# Altium PCB OmniCore_SDR.PcbDoc (part 4 of 13)
Units mil, origin at the board's own origin, x right, y up, seen from the top; angles counter-clockwise.
Board outline 4724.72 x 2755.91 mil, 8 copper layers (Top, GND 1, Layer 1, Layer 2, GND 2, Layer 3, Power, Bottom), stack 40.468 mil thick; 530 components, 427 nets, 2315 pads, 1715 vias.
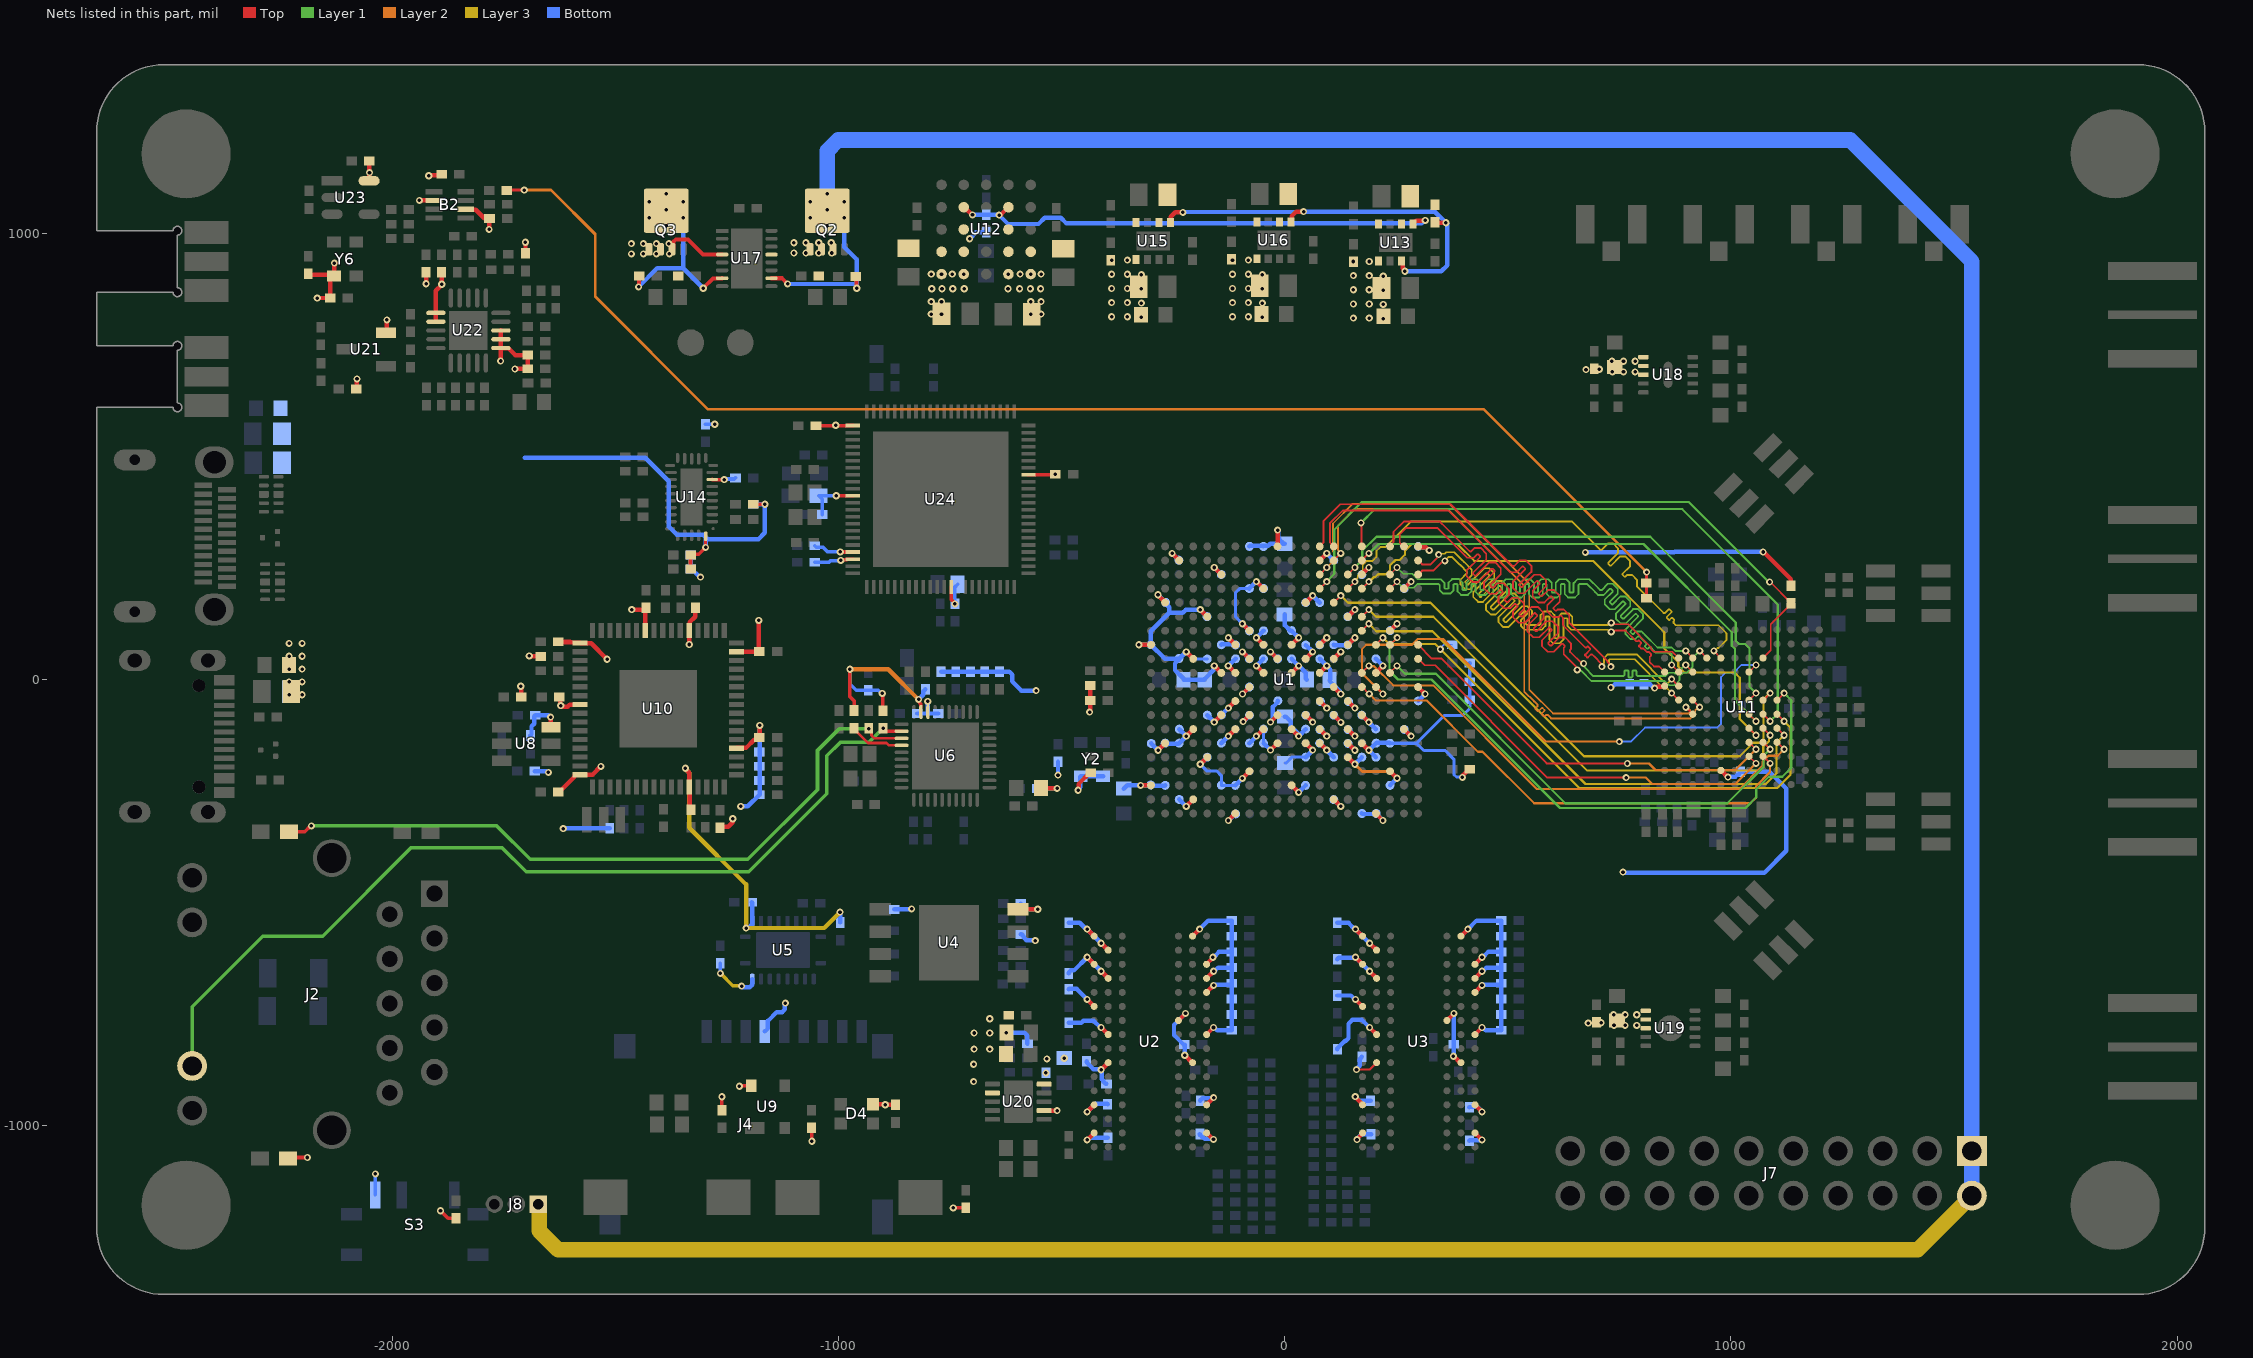
[diagram p9: the nets of this part, all layers, seen from the top]

## Via types
v1: diameter 16, hole 8, Top to Bottom, tented both sides, 1667 vias
v2: diameter 19.68, hole 7.87, Top to Bottom, 44 vias
v3: diameter 200, hole 125, Top to Bottom, 4 vias

## Nets (pads, with @x,y where several pads share a name; then routed paths per layer and width w, separated by ;. In a path a pad name is that pad's centre, name@x,y a point inside that pad or via, vN(x,y) a via of type N, cw(c..) or ccw(c..) an arc to the next point about the centre after c; other vN are vias at no path point)
1V0: C8.2 C9.2 C10.2 C11.2 C12.2 C13.2 C14.2 C15.2 C40.2 C41.2 C172.2 C173.2 C238.2 C241.1 C263.2 C264.2 C265.2 C266.2 C267.2 C268.2 C303.2 C307.2 U1.G7 U1.G11 U1.G13 U1.H10 U1.H12 U1.J7 U1.J13 U1.K12 U1.L7 U1.L13 U1.M12 U1.N7 U1.N13 U1.P8 U1.P12 U1.R7 U1.R13 U12.A1 U12.B1 U12.D1 U12.E1 | length 901.7
  Top w10: v1(-126.39,30.71) -126.31,30.71 -110.56,14.96 U1.G11@-110.48,14.96 ; v1(-126.23,-126.77) U1.G7@-110.48,-111.02 ; v1(-126.23,93.7) U1.G13@-110.48,77.95 ; v1(-94.73,62.2) U1.H12@-78.98,46.46 ; v1(-94.6,-32.28) -94.6,-32.22 -78.98,-16.6 U1.H10@-78.98,-16.54 ; v1(-63.24,-126.77) U1.J7@-47.49,-111.02 ; v1(-63.24,93.7) U1.J13@-47.49,77.95 ; v1(-31.74,62.2) U1.K12@-15.99,46.46 ; U1.L7@15.5,-111.02 v1(31.25,-126.77) ; U1.L13@15.5,77.95 v1(31.25,93.7) ; U1.M12@47,46.46 v1(62.75,62.2) ; U1.N7@78.5,-111.02 v1(94.24,-126.77) ; U1.N13@78.5,77.95 v1(94.24,93.7) ; U1.P8@109.99,-79.53 109.99,-79.66 126.1,-95.77 v1(126.1,-95.9) v1@126.23,-95.9 ; U1.P12@109.99,46.46 v1(125.74,62.2) ; U1.R7@141.36,-111.02 U1.R7@141.49,-111.02 v1(157.24,-126.77) ; U1.R13@141.49,77.95 v1(157.24,93.7)
  Bottom w10: C14.2@-142,77.9 -140.7,79.2 C173.2@-111.72,79.2 ; C41.2@-141.9,-142.4 v1(-126.23,-126.77) ; v1(-126.39,30.71) -126.14,30.71 -110.25,46.6 C266.2@-110,46.6 ; v1(-126.23,93.7) C173.2@-111.72,79.2 ; C173.2@-110.2,77.7 C173.2@-111.7,79.2 ; v1(-94.73,62.2) -94.73,62.07 -79.4,46.74 C40.2@-79.4,46.6 ; v1@-94.6,-32.24 C267.2@-79,-16.6 ; C268.2@-79,-142.5 v1@-63.25,-126.77 ; v1(-63.24,93.7) -63.12,93.7 -47.52,109.3 C9.2@-47.4,109.3 ; v1(-31.74,62.2) -31.57,62.2 -15.77,46.4 C8.2@-15.6,46.4 ; C303.2@-0.1,146.24 -0.1,121.3 0,121.2 1.19,121.2 12.77,109.63 15.4,109.63 31.25,93.77 v1(31.25,93.7) ; C307.2@0.4,-82.94 2.37,-82.94 13.12,-93.69 13.12,-104.58 30.1,-121.57 30.1,-125.62 v1(31.25,-126.77) ; v1@31.25,-126.71 47,-110.96 C263.2@47,-110.9 ; C11.2@47.3,77.4 47.43,77.4 62.62,62.2 v1(62.75,62.2) ; C10.2@78.5,77.9 v1(94.24,93.7) ; C264.2@79.1,-112 79.29,-112 94.06,-126.77 v1(94.24,-126.77) ; C13.2@110,78 111.3,76.7 140.3,76.7 C12.2@141.3,77.7 ; C15.2@110.15,-80 v1(126.1,-95.9) ; C12.2@141.3,77.7 v1(157.24,93.7) ; C265.2@142.1,-112 142.28,-112 157.05,-126.77 v1(157.24,-126.77)
  other v1: -792,819 -769,819 -569,819 -546,819 -792,847 -769,847 -569,847 -546,847 -791,876 -768,876 -744,876 -718,876 -620,876 -594,876 -570,876 -547,876 -792,908.69 -769,908.69 -745,908.69 -719,908.69 -619,908.69 -593,908.69 -569,908.69 -546,908.69
1V0_PG: R120.1 U12.B4 U12.D4 U13.1 | length 1123.7
  Top w10: U12.B4@-719,1058.69 -717.92,1058.69 -700.71,1041.47 v1(-699.63,1041.47) ; v1(-640,1041) -638.85,1042.15 -635.54,1042.15 U12.D4@-619,1058.69 ; U13.1@287.39,1020.71 287.39,1022.68 290.26,1025.55 292.23,1025.55 294.53,1027.85 314.01,1027.85 v1(315.16,1029)
  Bottom w10: v1(-699.63,1041.47) -699.58,1041.42 -669.05,1041.42 R120.1@-669,1041.37 -668.82,1041.19 -640.18,1041.19 v1(-640,1041) -620,1021 -551.69,1021 -537.69,1035 -502,1035 -490,1023 307.53,1023 313.53,1029 v1(315.16,1029)
1V8: C24.2 C25.2 C26.2 C27.2 C28.2 C29.2 C30.2 C31.2 C46.2 C47.2 C59.2 C60.2 C64.2 C65.2 C66.2 C67.2 C68.2 C69.2 C72.2 C73.2 C132.1 C136.2 C137.2 C138.2 C176.2 C180.2 C187.2 C189.2 C190.2 C191.2 C204.2 C205.2 C234.2 C248.2 C253.2 C254.2 C258.2 C259.2 C269.2 C270.2 C271.2 C272.2 C301.2 C306.2 C309.2 L1.2 L2.2 R5.1 R6.1 R64.1 R65.1 R66.1 R67.1 R69.2 R119.2 R122.2 U1.A13 U1.B16 U1.D12 U1.E15 U1.F8 U1.F11 U1.G9 U1.H8 U1.J11 U1.K8 U1.L11 U1.M8 U1.N9 U1.N11 U1.N19 U1.P10 U1.R9 U1.R15 U1.T8 U1.T18 U1.U11 U1.V14 U1.W7 U1.W17 U1.Y10 U1.Y20 U5.2 U6.28 U10.12 U10.37 U10.49 U10.64 U11.B8 U11.H12 U13.4 U13.5 U18.1 U18.2 U18.3 U19.1 U19.2 U19.3 | length 4682.6
  Top w4.2: v1(-800,-49) -799.7,-49.3 -799.7,-72.3 U6.28@-799.4,-72.6
  Top w10: C189.2@-1627.65,-252 -1625.69,-252 -1590.46,-216.78 -1590.46,-214.02 -1589.56,-213.11 U10.64@-1578.73,-213.11 -1551.11,-213.11 v1(-1532.4,-194.4) ; v1(-1518.6,45.6) -1554.26,81.26 -1577.83,81.26 U10.49@-1578.73,82.17 -1579.64,83.07 -1598.91,83.07 ; v1(-1343.1,-198.7) -1343.1,-200.32 -1334.64,-208.79 U10.12@-1334.64,-240.67 ; v1(-1334.38,78.56) -1334.38,109.47 U10.37@-1334.64,109.72 -1333.73,110.63 -1333.73,128.27 -1321,141 -1321,160.65 C191.2@-1320.34,161.31 ; U10.12@-1333.73,-242.48 -1333.73,-287.92 C190.2@-1330.34,-291.31 ; v1(-437,-73) -436.18,-72.18 -436.18,-47.81 R5.1@-435.37,-47 R6.1@-435.37,-13 ; v1(-326.63,77.98) U1.A13@-299.46,77.95 ; v1(-283.94,190) -283.94,189.21 -267.96,173.23 U1.B16@-267.96,172.44 ; v1(-220.72,62.2) U1.D12@-204.97,46.46 ; v1(-189.22,156.69) U1.E15@-173.47,140.94 ; v1(-157.72,-95.28) U1.F8@-141.98,-79.53 ; v1(-157.72,30.71) U1.F11@-141.98,14.96 ; v1(-126.23,-63.78) U1.G9@-110.48,-48.03 ; v1(-93.18,-94.28) -93.18,-94 -78.98,-79.81 U1.H8@-78.98,-79.53 ; v1(-63.24,30.71) U1.J11@-47.49,14.96 ; v1(-31.74,-95.28) U1.K8@-15.99,-79.53 ; U1.L11@15.5,14.96 v1(31.25,30.71) ; U1.M8@47,-79.53 v1(62.75,-95.28) ; U1.N9@78.5,-48.03 v1(94.24,-63.78) ; U1.N11@78.5,14.96 v1(94.24,30.71) ; U1.N19@78.5,266.93 v1(94.24,282.68) ; U1.P10@109.99,-16.54 v1(125.74,-32.28) ; U1.R9@141.49,-48.03 v1(157.24,-63.78) ; U1.R15@141.49,140.94 v1(157.24,156.69) ; U1.T8@172.98,-79.53 v1(188.73,-95.28) ; U1.T18@172.98,235.43 v1(188.73,251.18) ; U1.U11@204.48,14.96 v1(220.23,30.71) ; U1.V14@235.98,109.45 v1(251.72,125.2) ; U1.W7@267.47,-111.02 v1(283.22,-126.77) ; U1.W17@267.47,203.94 v1(283.22,219.68) ; U1.Y10@298.97,-16.54 v1(314.72,-32.28) ; U1.Y20@298.97,298.43 300.44,296.95 315.93,296.95 323.38,289.5 v1(324,289.5) ; v1(829,-19) 830.62,-19 833.91,-15.72 850.34,-15.72 U11.H12@851.51,-14.54 ; U11.B8@977.5,-203.52 977.98,-203.52 993.01,-218.54 v1(993.5,-218.54) ; v1(1072.25,285.86) 1073.5,285.86 1134.5,224.86 1134.5,210.19 R119.2@1134.4,210.09 ; -1598.91,83.07 -1625.72,83.07 C187.2@-1627.65,85 -1600.84,85 -1598.91,83.07
  Layer 3 w10: v1(-1343.1,-198.7) -1343.1,-200.32 -1334.4,-209.02 -1334.4,-331.74 -1207,-459.14 v1(-1207,-557) -1206.69,-556.69 -1031.98,-556.69 v1(-996.46,-521.17)
  Bottom w7: v1(-220.72,62.2) -204.72,46.21 C176.2@-173.42,46.21
  Bottom w10: v1(-1207,-557) -1205.85,-555.85 -1201.35,-555.85 U5.2@-1193.39,-547.89 ; C132.1@-1194.53,-499.04 -1193.11,-500.46 U5.2@-1193.11,-547.61 ; v1(-996.46,-521.17) -996.34,-521.29 -996.34,-544.23 R69.2@-996.21,-544.35 ; C136.2@-823,-76 -799.5,-76 ; v1(-800,-49) -799.5,-49.5 -799.5,-76 ; C137.2@-776,-76 -799.5,-76 ; R64.1@-770,17.68 R65.1@-737,17.68 R66.1@-704,17.68 R67.1@-672,17.68 C138.2@-639,17.69 -616.86,17.69 -610.51,11.34 -610.51,-4.22 -590.13,-24.6 v1(-557.1,-24.6) ; v1(-326.63,77.98) C270.2@-299.9,78 ; v1(-283.94,190) C269.2@-266.9,173 -266.9,170.29 -259,162.39 -259,149.5 ; C271.2@-237.88,47.1 -269,47.1 C270.2@-299.9,78 ; C271.2@-236.41,45.63 -245.8,36.24 -245.8,20.93 -226.44,1.57 C309.2@-226.44,-0.4 -179.26,-0.4 L1.2@-179.16,-0.5 -179.16,1.47 -158.87,21.76 -158.87,29.56 v1(-157.72,30.71) ; C271.2@-236.41,46.51 v1(-220.72,62.2) ; C272.2@-174,141.1 -174,141.29 -189.22,156.51 v1(-189.22,156.69) -221.33,156.69 -228.52,149.5 -259,149.5 ; C47.2@-173.4,-79.6 v1(-157.72,-95.28) ; C180.2@-141.9,-79.6 -141.9,-79.53 -126.23,-63.85 v1(-126.23,-63.78) ; v1(-93.18,-94.28) -93.18,-94.18 -79,-80 C28.2@-79,-79.9 ; v1(-63.24,30.71) C25.2@-47.5,46.4 ; v1(-31.74,-95.28) -31.74,-93.65 -26.32,-88.23 -26.32,-61.22 -15.2,-50.11 C27.2@-15.2,-47.4 ; C24.2@15.4,46.4 15.48,46.4 31.17,30.71 v1(31.25,30.71) 32.29,30.71 47.4,15.6 47.4,2.16 L2.2@49.56,0 ; C46.2@47.1,-80 47.29,-80 62.56,-95.28 v1(62.75,-95.28) ; C26.2@78.6,46.4 v1(94.24,30.71) ; C30.2@79.9,-49 79.9,-49.22 94.24,-63.56 v1(94.24,-63.78) ; v1(94.24,30.71) 94.24,30.46 102.3,22.4 102.3,0.86 C306.2@100.44,-1 100.44,-2.97 124.59,-27.12 124.59,-31.14 v1(125.74,-32.28) ; v1(94.24,282.68) 94.33,282.68 110.01,267 C59.2@110.1,267 ; C72.2@141.4,140.9 v1(157.24,156.69) ; C31.2@142.9,-49 142.9,-49.22 157.24,-63.56 v1(157.24,-63.78) ; C29.2@172.7,-79.6 172.88,-79.6 188.55,-95.28 v1(188.73,-95.28) 188.73,-95.45 204,-110.72 C65.2@204,-110.9 ; C69.2@173,235.1 173,235.28 188.73,251.01 v1(188.73,251.18) ; C68.2@204.5,46.5 v1(220.23,30.71) ; C67.2@236.3,109.7 v1(251.72,125.2) ; C64.2@267.9,-111.6 267.97,-111.6 283.15,-126.77 v1(283.22,-126.77) ; C73.2@268,204.1 268,204.28 283.22,219.5 v1(283.22,219.68) ; C66.2@299.2,-47.8 v1(314.72,-32.28) ; C60.2@299.3,298.5 301.21,296.59 315.29,296.59 322.38,289.5 v1(324,289.5) ; v1(673.9,284.9) 872.44,284.9 874.14,286.6 v1@1071.06,286.6 ; v1(731,-17.7) 732.62,-17.7 739.47,-10.86 C205.2@773.5,-10.86 C301.2@805.5,-10.86 819.23,-10.86 827.38,-19 v1(829,-19) ; v1(758.16,-431.34) 759.82,-433 1075.2,-433 1124.3,-383.9 1124.3,-244.1 1086.43,-206.23 C204.2@1021.5,-206.23 1021.5,-208.2 1016.65,-213.04 1014.69,-213.04 1010.33,-217.4 994.64,-217.4 v1(993.5,-218.54) ; C270.2@-299.9,78 -299.91,108.59 -259,149.5
  other v1: 738,-775 763,-775 789,-775 680.3,-769.7 709,-769 737,-751 763,-751 789,-751 734.3,689.5 759.3,689.5 785.3,689.5 675.3,694.5 705.3,695.5 733.3,713.5 759.3,713.5 785.3,713.5 221,809 154,810 189.56,810 221,840.75 154,841.75 189.56,841.75 221,872.5 189.56,873.5 154,873.5 221,904.25 154,905.25 189.56,905.25 154,937 189.56,937
1V8_PG: R121.1 U13.7 U15.1 U16.1 | length 937.2
  Top w10: U15.1@-256.17,1024.02 -255,1025.2 -255,1037 -245,1047 v1(-228,1047) ; U16.1@14.39,1025.71 15.56,1026.88 15.56,1038.69 25.56,1048.69 v1(42.56,1048.69) ; U13.7@261.8,938.03 264.67,935.16 264.67,921.39 269.34,916.71 v1(269.34,915.09) ; R121.1@337,1024.69 337.46,1024.22 360.91,1024.22 v1(361.37,1023.76)
  Bottom w10: v1(-228,1047) -227.16,1047.84 41.72,1047.84 v1(42.56,1048.69) 336.45,1048.69 v1(361.37,1023.76) 364,1021.13 364,928.18 350.91,915.09 v1(269.34,915.09)
1V35: C16.2 C17.2 C18.2 C19.2 C20.2 C21.2 C22.2 C23.2 C44.2 C45.2 C76.2 C77.2 C78.2 C79.2 C80.2 C81.2 C82.2 C83.2 C84.2 C85.2 C86.2 C87.2 C88.2 C89.2 C90.2 C91.2 C92.2 C93.2 C94.2 C95.2 C96.2 C97.2 C98.2 C99.2 C100.2 C101.2 C102.2 C103.2 C104.2 C105.2 C106.2 C107.2 C108.2 C109.2 C110.2 C111.2 C123.2 C124.2 C167.1 C168.1 C174.2 C175.2 C293.2 C294.2 C305.2 R28.1 R30.2 R128.2 U1.A3 U1.D2 U1.E5 U1.G1 U1.H4 U1.L3 U1.P2 U1.R5 U1.U1 U1.V4 U2.A1 U2.A8 U2.B2 U2.C1 U2.C9 U2.D2 U2.D9 U2.E9 U2.F1 U2.G7 U2.H2 U2.H9 U2.K2 U2.K8 U2.N1 U2.N9 U2.R1 U2.R9 U3.A1 U3.A8 U3.B2 U3.C1 U3.C9 U3.D2 U3.D9 U3.E9 U3.F1 U3.G7 U3.H2 U3.H9 U3.K2 U3.K8 U3.N1 U3.N9 U3.R1 U3.R9 U16.4 U16.5 U20.2 | length 4002.9
  Top w5: v1(161,-874) 190.48,-874 U3.K2@206.02,-858.46
  Top w10: v1(-442.72,-1031.69) U2.R1@-426.98,-1015.94 ; v1(-442.72,-968.7) U2.N1@-426.98,-952.95 ; v1(-442.72,-716.73) U2.F1@-426.98,-732.48 ; v1(-442.72,-622.24) U2.C1@-426.98,-637.99 ; v1(-442.72,-559.25) U2.A1@-426.98,-575 ; v1(-411.23,-874.21) U2.K2@-395.48,-858.46 ; v1(-411.23,-779.72) U2.H2@-395.48,-795.47 ; v1(-411.23,-653.74) U2.D2@-395.48,-669.49 ; v1(-411.23,-590.75) U2.B2@-395.48,-606.49 ; v1(-323,-237) U1.A3@-299.46,-237.01 ; U2.G7@-238,-763.97 v1(-222.25,-748.23) ; v1(-224,-842) -223.48,-842 -207.02,-858.46 U2.K8@-206.5,-858.46 ; v1(-220.5,-284.25) -220.5,-284.14 -204.97,-268.61 U1.D2@-204.97,-268.5 ; U2.A8@-206.5,-575 v1(-190.76,-559.25) ; v1(-189.22,-189.76) U1.E5@-173.47,-174.02 ; U2.R9@-175.01,-1015.94 -174.53,-1015.94 -159.98,-1030.5 v1(-159.5,-1030.5) ; U2.N9@-175.01,-952.95 -175.01,-952.74 -159.41,-937.14 v1(-159.41,-936.93) ; U2.H9@-175.01,-795.47 -175.01,-795.35 -159.5,-779.84 v1(-159.5,-779.72) ; U2.E9@-175.01,-700.98 v1(-159.26,-685.23) ; U2.D9@-175.01,-669.49 v1(-159.26,-653.74) ; U2.C9@-175.01,-637.99 -175.01,-637.2 -160.85,-623.04 v1(-160.85,-622.24) ; v1(-126.23,-315.75) U1.G1@-110.48,-300 ; v1(-94.73,-221.5) -94.73,-221.38 -78.98,-205.63 U1.H4@-78.98,-205.51 ; U1.L3@15.5,-237.01 v1(31.25,-252.76) ; U1.P2@109.99,-268.5 v1(125.74,-284.25) ; U1.R5@141.49,-174.02 v1(157.24,-189.76) ; v1(158.1,-934.5) 158.1,-935.51 174.52,-951.94 U3.N1@174.52,-952.95 ; v1(158.77,-716.73) U3.F1@174.52,-732.48 ; v1(158.77,-622.24) U3.C1@174.52,-637.99 ; v1(158.77,-559.25) U3.A1@174.52,-575 ; v1(162,-1031) 162,-1029.73 174.52,-1017.21 U3.R1@174.52,-1015.94 ; v1(190.27,-779.72) U3.H2@206.02,-795.47 ; v1(190.27,-653.74) U3.D2@206.02,-669.49 ; v1(190.27,-590.75) U3.B2@206.02,-606.49 ; U1.U1@204.48,-300 v1(220.23,-315.75) ; U1.V4@235.98,-205.51 v1(251.72,-221.26) ; U3.G7@363.5,-763.97 v1(379.25,-748.23) ; v1(378,-844) 379.27,-844 393.73,-858.46 U3.K8@394.99,-858.46 ; U3.A8@394.99,-575 v1(410.74,-559.25) ; U3.R9@426.49,-1015.94 v1(442.24,-1031.69) ; U3.N9@426.49,-952.95 v1(442.24,-968.7) ; U3.H9@426.49,-795.47 v1(442.24,-779.72) ; U3.E9@426.49,-700.98 v1(442.24,-685.23) ; U3.D9@426.49,-669.49 v1(442.24,-653.74) ; U3.C9@426.49,-637.99 v1(442.24,-622.24)
  Layer 2 w7: v1(157.24,-189.76) 173.19,-205.71 236.18,-205.71 v1(251.72,-221.26)
  Bottom w7: v1(-189.22,-189.76) -173.72,-205.26 -151.8,-205.26 -141.9,-215.16 C23.2@-141.9,-236.8 -141.75,-236.95 -110.55,-236.95 R28.1@-110.4,-237.1
  Bottom w10: v1(-623.56,-791) -583.5,-791 -576.8,-797.7 -576.8,-815.51 R30.2@-576.31,-816 ; C87.2@-484,-769.31 -455.52,-769.31 -451.21,-765 -427.57,-765 -412.85,-779.72 v1(-411.23,-779.72) ; C88.2@-484,-694.31 -482.68,-693 -466.45,-693 v1(-442.72,-716.73) ; C85.2@-484,-658.69 -484,-656.72 -479.16,-651.87 -472.36,-651.87 v1(-442.72,-622.24) v1(-411.23,-653.74) ; C96.2@-484,-544.63 -458.97,-544.63 -444.35,-559.25 v1(-442.72,-559.25) v1(-411.23,-590.75) ; C123.2@-444,-855.69 -444,-857.65 -428.59,-873.06 -412.38,-873.06 v1(-411.23,-874.21) -410.08,-875.36 -410.08,-895.23 -406.13,-899.19 -406.13,-901.16 -401.28,-906 C92.2@-399.31,-906 ; v1(-442.72,-1031.69) -441.1,-1031.69 -435.73,-1026.31 C80.2@-396,-1026.31 ; v1(-442.72,-968.7) -425.03,-951 -397.31,-951 C86.2@-397,-951.31 ; C305.2@-360.6,-244.54 -353.06,-237 v1(-323,-237) -322.55,-236.55 -300.45,-236.55 C174.2@-300,-236.1 -298.09,-238.01 -291.01,-238.01 -290.75,-238.27 -268.97,-238.27 C44.2@-267.8,-237.1 ; C175.2@-236.4,-268.6 -236.28,-268.6 -220.62,-284.25 v1(-220.5,-284.25) ; v1(-224,-842) -224.34,-841.66 -224.34,-818.34 C82.2@-224.69,-818 -226.65,-818 -248,-796.65 -248,-773.97 v1(-222.25,-748.23) ; v1(-190.76,-559.25) -171.51,-540 C91.2@-118.69,-540 C90.2@-118.69,-575.14 C93.2@-118.69,-610.29 ; C81.2@-190,-1018.31 -190,-1020.28 -185.16,-1025.13 -183.19,-1025.13 -178.96,-1029.35 -160.65,-1029.35 v1(-159.5,-1030.5) ; v1(-189.22,-189.76) -189.22,-189.64 -173.6,-174.02 C17.2@-173.6,-173.9 ; C79.2@-189,-944.31 -189,-942.49 -184.16,-937.65 -184.16,-938.08 -160.56,-938.08 v1(-159.41,-936.93) ; v1(-160.85,-622.24) -159.22,-622.24 -147.27,-610.29 C93.2@-118.69,-610.29 ; v1(-159.5,-779.72) -157.88,-779.72 -151.6,-786 C83.2@-118.69,-786 C84.2@-118.69,-750.86 C89.2@-118.69,-715.71 C94.2@-118.69,-680.57 ; v1(-159.26,-685.23) -158.11,-684.09 -122.2,-684.09 C94.2@-118.69,-680.57 ; v1(-159.26,-653.74) -157.64,-653.74 -149.33,-645.43 C95.2@-118.69,-645.43 ; v1(-126.23,-315.75) -125.44,-315.75 -110.69,-301 C16.2@-109.9,-301 ; R28.1@-110.4,-237.1 v1@-94.77,-221.5 ; v1(31.25,-252.76) 31.25,-252.7 46.8,-237.15 C18.2@46.8,-237.1 ; C22.2@110.1,-269 110.29,-269 125.55,-284.25 v1(125.74,-284.25) ; C102.2@118,-707.98 148.4,-707.98 157.15,-716.73 v1(158.77,-716.73) ; C104.2@118,-626.65 121.26,-623.39 157.63,-623.39 v1(158.77,-622.24) v1(190.27,-653.74) ; C101.2@118,-545.32 143.22,-545.32 157.15,-559.25 v1(158.77,-559.25) v1(190.27,-590.75) ; C103.2@118.09,-828.69 118.09,-826.72 134.09,-810.72 135.93,-810.72 143,-803.65 143,-771.45 151.73,-762.72 173.27,-762.72 v1(190.27,-779.72) ; v1@157.24,-189.71 C20.2@173.1,-173.85 ; v1(158.1,-934.5) 167.91,-944.31 C76.2@192.5,-944.31 ; v1(161,-874) 161,-872.38 168.16,-865.22 168.16,-850.53 C124.2@173,-845.69 ; v1(162,-1031) 163.15,-1029.85 163.15,-1027.32 171.15,-1019.31 C77.2@193.5,-1019.31 ; C45.2@173.1,-300 174.35,-301.25 206.04,-301.25 220.23,-315.44 v1(220.23,-315.75) ; C19.2@236.1,-237 236.1,-236.94 v1(251.72,-221.26) v1(251.72,-221.26) ; v1(378,-844) 378.66,-843.34 378.66,-748.81 v1(379.25,-748.23) ; v1(410.74,-559.25) 429.99,-540 C106.2@485.31,-540 C105.2@485.31,-575.14 C108.2@485.31,-610.29 ; C111.2@414,-1033.31 414.81,-1032.5 441.43,-1032.5 v1(442.24,-1031.69) ; C110.2@414,-958.31 414.49,-957.82 432.98,-957.82 442.24,-967.07 v1(442.24,-968.7) ; v1(442.24,-779.72) 443.86,-779.72 450.14,-786 C107.2@485.31,-786 C97.2@485.31,-750.86 C98.2@485.31,-715.71 C99.2@485.31,-680.57 ; v1(442.24,-685.23) 443.39,-684.09 481.8,-684.09 C99.2@485.31,-680.57 ; v1(442.24,-653.74) 443.86,-653.74 452.17,-645.43 C100.2@485.31,-645.43 ; v1(442.24,-622.24) 443.86,-622.24 455.82,-610.29 C108.2@485.31,-610.29 ; C94.2@-118.69,-680.57 C95.2@-118.69,-645.43 ; C95.2@-118.69,-645.43 C93.2@-118.69,-610.29 ; C99.2@485.31,-680.57 C100.2@485.31,-645.43 ; C100.2@485.31,-645.43 C108.2@485.31,-610.29
  other v1: -697,-901 -697,-862 -696,-828 -661,-828 -696,-792 -661,-792 -661,-760 -50,812 -117,813 -81.44,813 -50,843.75 -117,844.75 -81.44,844.75 -117,876.5 -81.44,876.5 -50,875.5 -50,907.25 -117,908.25 -81.44,908.25 -117,940 -81.44,940
3V3: B2.2 B2.6 C1.1 C2.2 C5.1 C32.2 C33.2 C34.2 C35.2 C42.2 C43.2 C48.2 C49.2 C50.2 C51.2 C52.2 C53.2 C54.2 C55.2 C56.2 C57.2 C70.2 C71.2 C112.1 C113.1 C126.1 C129.1 C130.1 C133.1 C143.2 C144.2 C145.2 C154.2 C155.2 C163.2 C170.2 C179.2 C181.2 C182.2 C183.2 C184.2 C185.2 C188.2 C192.2 C193.2 C194.2 C195.2 C198.2 C247.2 C262.1 C273.1 C281.2 C282.2 C283.2 C284.2 C287.1 C288.1 C289.1 C292.2 C304.2 C308.2 D4.4 J4.4 L4.1 R1.1 R4.1 R9.2 R13.1 R14.1 R18.2 R19.2 R21.2 R22.2 R29.2 R63.2 R72.1 R74.1 R77.1 R78.1 R89.1 R90.2 R95.2 R96.2 R97.2 R98.2 R101.1 R102.2 R103.2 R104.2 R107.2 R108.1 R113.2 R127.2 S3.3 U1.B6 U1.C19 U1.D7 U1.F18 U1.H14 U1.J17 U1.K6 U1.K20 U1.M6 U1.M16 U1.N6 U1.R6 U1.T6 U4.8 U5.19 U6.29 U8.6 U9.4 U10.20 U10.31 U10.42 U10.56 U14.8 U15.4 U15.5 U20.7 U20.10 U21.3 U22.6 U22.7 U22.16 U22.17 U22.18 U23.5 U24.1 U24.11 U24.19 U24.20 U24.35 U24.59 Y2.1 Y2.4 Y6.4 | length 5370.5
  Top w8: v1(-1891.84,-1190.4) -1874.85,-1207.38 R14.1@-1856.9,-1207.38 ; U14.8@-1282.72,448.37 -1282.53,448.18 -1256.18,448.18 v1(-1256,448) ; v1(-1261.3,-935) -1261.2,-935.1 -1261.2,-964.91 C113.1@-1261.1,-965.01 ; v1(-1221.87,-911.45) -1220.88,-910.46 U9.4@-1195.5,-910.46 ; R4.1@-1060.1,-1004.39 -1059.75,-1004.74 -1059.75,-1034.25 v1(-1059.4,-1034.6) ; C163.2@-1050.31,569 -980,569 -979.6,569.4 U24.1@-967.9,569.4 ; v1(-1005,412) v1(-1005,412) -967.95,411.95 U24.11@-967.9,411.9 ; v1(-996,286) v1(-996,286) -967.95,285.95 U24.19@-967.9,285.9 ; v1(-995,267) -993.47,268.53 -981.17,268.53 -979.6,270.1 U24.20@-967.9,270.1 ; v1(-974.5,23.2) -974.5,-38.1 -965,-47.6 R72.1@-965,-69.32 ; v1(-901.79,-30.81) -900.89,-31.71 -900.89,-68.74 R89.1@-900,-69.63 ; v1(-820.47,-44.47) -818.94,-46 -818.94,-51.23 -815.16,-55 U6.29@-815.16,-60.85 ; U24.35@-747.4,207.2 -747.4,179.45 -739,171.05 v1(-739,169.69) ; v1(-742.82,-1183.84) -742.67,-1183.68 R13.1@-714.7,-1183.68 ; U24.59@-574.2,459.1 -574.15,459.15 -514.54,459.15 v1(-513.68,460) ; L4.1@-546.44,-243 L4.1@-545.44,-244
  Top w10: R74.1@-2233.5,-1073 -2231.5,-1071 v1(-2190,-1071) ; C262.1@-2188.35,909.35 -2185.95,906.95 -2132.75,906.95 Y6.4@-2130.35,904.55 ; v1(-2168,855) -2167.83,855.17 -2139.52,855.17 C273.1@-2139.35,855.35 -2139.35,897.15 -2131.95,904.55 Y6.4@-2130.35,904.55 ; v1(-2129.73,933.4) -2130.35,932.78 Y6.4@-2130.35,904.55 ; R108.1@-2080.66,651.35 -2079.83,652.18 -2079.83,673.17 v1(-2079,674) ; U23.5@-2051.99,1117.75 -2051.99,1135.01 v1(-2051,1136) -2051.33,1136.33 -2051.33,1162.02 C289.1@-2051.66,1162.35 ; U21.3@-2013.84,777.34 -2012,779.18 v1(-2012,806) ; v1(-1939,1074) -1938.86,1073.86 -1906.35,1073.86 B2.2@-1906.21,1073.72 ; C283.2@-1924.35,912.66 -1924.17,912.49 -1924.17,887.17 v1(-1924,887) ; v1(-1918,1129) -1916.85,1130.15 -1891.23,1130.15 C288.1@-1889.03,1132.35 ; U22.7@-1902.18,802.03 U22.6@-1902.18,821.72 -1902.18,871.2 -1889,884.38 v1(-1889,886) -1889.17,886.17 -1889.17,912.49 C284.2@-1889.35,912.66 ; B2.6@-1835.35,1054.03 -1834.44,1053.13 -1813.13,1053.13 -1794,1034 -1782.68,1034 C287.1@-1782.03,1033.35 -1782.52,1032.86 -1782.52,1009.48 v1(-1783,1009) ; v1(-1757,714) -1757,742.9 -1756.92,742.98 U22.16@-1756.51,742.98 ; U22.18@-1756.51,782.35 U22.17@-1756.51,762.66 U22.16@-1756.51,742.98 ; v1(-1725,696) -1724.83,696.17 -1696.2,696.17 C282.2@-1696.03,696.35 C281.2@-1696.03,727.35 -1724.31,727.35 -1739.94,742.98 U22.16@-1756.51,742.98 ; v1(-1712,-15) -1711.33,-15.67 -1711.33,-38.33 C179.2@-1710.65,-39 ; v1(-1701.58,980.18) -1701.35,979.95 R101.1@-1701.35,955.03 ; v1(-1693,53) -1692.5,52.5 -1667.52,52.5 R90.2@-1667.02,52 ; v1(-1645,-84) -1645,-105.82 U8.6@-1644.22,-106.6 ; C195.2@-1625.65,-39 -1623.61,-41.05 -1623.61,-57.31 v1(-1622.46,-58.46) ; v1@-1623.38,-61 -1621.98,-59.61 -1619.69,-59.61 -1618.29,-61 -1607,-61 -1602.11,-56.11 -1579.21,-56.11 U10.56@-1578.73,-55.63 ; v1(-1463.3,156.9) C193.2@-1433.06,156.9 ; U10.42@-1433.06,109.72 -1433.06,159.59 C193.2@-1431.34,161.31 ; R107.2@-1265.34,-331.69 -1263.65,-330 -1247,-330 -1237,-320 v1(-1237,-312) ; U10.20@-1228.34,-154.06 -1227.43,-153.15 -1207.15,-153.15 -1188.84,-134.84 -1183.83,-134.84 -1176.51,-127.52 -1176.76,-127.27 -1176.76,-102.96 v1(-1176.5,-102.7) ; U10.31@-1228.34,62.48 -1228.08,62.74 C194.2@-1177.28,62.74 ; v1(-1178.7,132.7) -1178.7,64.16 C194.2@-1177.28,62.74 ; C194.2@-1177.02,63 C194.2@-1177.28,62.74 ; D4.4@-922.78,-951.45 -922.1,-952.12 -895.88,-952.12 v1(-895.2,-952.8) -894.99,-953.01 -872.31,-953.01 C112.1@-872.1,-953.22 ; U4.8@-597.7,-515 -553.69,-515 v1(-553.44,-514.74) ; L4.1@-545.44,-244 v1(-510,-244) ; U20.7@-538.93,-965.68 -538.77,-965.84 -510.16,-965.84 v1(-510,-966) ; v1(-463,-248) -461.85,-246.85 -461.85,-234.2 -436.65,-209 R9.2@-434.69,-209 R9.2@-433.84,-209.84 ; v1(-283.71,-158.27) U1.B6@-267.96,-142.52 ; v1(-252.21,282.68) U1.C19@-236.46,266.93 ; v1(-220.72,-126.77) U1.D7@-204.97,-111.02 ; v1(-157.72,251.18) U1.F18@-141.98,235.43 ; v1(-94.73,125.2) U1.H14@-78.98,109.45 ; v1(-63.5,219.68) -63.37,219.68 -47.62,203.94 U1.J17@-47.49,203.94 ; v1(-31.74,-158) -31.61,-158 -16.13,-142.52 U1.K6@-15.99,-142.52 ; U1.K20@-15.99,298.43 v1(-16,335) ; U1.M6@47,-142.52 47.13,-142.52 62.61,-158 v1(62.75,-158) ; U1.M16@47,172.44 v1(62.75,188.19) ; U1.N6@78.5,-142.52 78.61,-142.52 94.09,-158 v1(94.21,-158) ; U1.R6@141.49,-142.52 v1(157.24,-158.27) ; U1.T6@172.98,-142.52 v1(188.73,-158.27) ; v1(398.4,-219.1) 399.55,-217.95 399.55,-214.17 412.72,-201 R22.2@414.69,-201
  Layer 2 w10: v1(-974.5,23.2) -888.14,23.2 v1(-820.47,-44.47)
  Layer 3 w8: v1(-1264.5,-658.4) -1237,-685.9 -1218.1,-685.9 v1(-1217,-687)
  Bottom w7: v1(-94.73,125.2) -110.23,140.7 -110.23,194.61 -100.94,203.9 C56.2@-79.1,203.9 ; C49.2@-47.5,-142.4 -47.45,-111.15 C33.2@-47.4,-111.1 ; C308.2@0.9,-187.14 2.87,-187.14 16.21,-173.8 C35.2@47,-173.8 ; C181.2@235.9,-142.6 295.48,-142.6 ; v1(398.4,-219.1) 397.7,-218.4 385,-218.4 379.15,-212.55 379.15,-178.25 359.9,-159 311.88,-159 295.48,-142.6 ; R19.2@414.69,37 C5.1@414.69,-5 R21.2@414.69,-45 415.5,-45.82 415.5,-63.6 398.52,-80.58 357.5,-80.58 295.48,-142.6
  Bottom w8: v1(-2037.8,-1107.9) -2037.75,-1107.95 -2037.75,-1154.85 S3.3@-2037.7,-1154.9 ; R78.1@-1331.32,248 R78.1@-1329.35,248 ; R1.1@-1298,572.37 -1277.41,572.37 v1(-1277.32,572.29) ; C133.1@-1265.1,-635.7 -1264.8,-636 -1264.8,-658.1 v1(-1264.5,-658.4) ; v1(-1256,448) -1254.47,449.53 -1233.15,449.53 C1.1@-1230.68,452 ; C198.2@-1053.31,263 -1021.16,263 -1018.16,266 -996,266 v1(-995,267) ; C188.2@-1053.31,300 -1049.52,296.2 -1034.49,296.2 -1024.28,286 v1(-996,286) ; C170.2@-1036.31,370 -1036.31,403.81 C185.2@-1044.5,412 v1(-1005,412) ; v1(-974.5,23.2) -974.5,-9 -959.81,-23.69 C145.2@-933,-23.69 -911.08,-23.69 -903.95,-30.81 v1(-901.79,-30.81) ; v1(-739,169.69) -739,207.5 C155.2@-733,213.5
  Bottom w10: R104.2@-1690.34,-125.31 -1687.89,-122.87 -1687.89,-104.89 -1681.98,-98.98 -1681.98,-82.33 R102.2@-1679.65,-80 -1650.62,-80 -1646.62,-84 v1(-1645,-84) ; R103.2@-1680.65,-205 -1654.62,-205 -1651.62,-208 v1(-1650,-208) ; v1(-1616.8,-333.9) -1616.19,-333.29 -1512.95,-333.29 R113.2@-1512.34,-332.69 ; R78.1@-1331.32,249.97 R77.1@-1331.32,279 ; R78.1@-1329.35,248 -1312.19,230.85 -1310.35,230.85 v1(-1309.2,229.7) ; v1(-1218.83,-284.18) -1203.21,-284.18 R95.2@-1177.02,-258 -1176.76,-257.74 -1176.76,-102.96 v1(-1176.5,-102.7) ; v1(-1217,-687) -1214,-690 -1199.24,-690 -1193.39,-684.14 -1193.39,-671.28 U5.19@-1193.11,-671 ; J4.4@-1164.75,-788.56 -1157.94,-781.75 -1157.94,-764.94 -1138.02,-745.02 -1126.01,-745.02 -1120.15,-739.17 -1120.15,-726.15 v1(-1119,-725) ; R63.2@-875,-515 -874.5,-514.5 -836.5,-514.5 v1(-836,-514) ; v1(-820.47,-44.47) -809.84,-33.84 -809.84,-26.53 C143.2@-805,-21.69 ; R18.2@-591.31,-571 -589.35,-571 -584.5,-575.84 -584.5,-577.99 -578.65,-583.85 -560.15,-583.85 v1(-559,-585) ; C129.1@-591.32,-502 -591,-502.31 -591,-508.89 -585.14,-514.74 v1(-553.44,-514.74) ; C144.2@-554.31,-244 v1(-510,-244) ; v1@-507.97,-213.97 C2.2@-508,-184.37 ; v1(-463,-248) -463,-246.38 -458,-241.38 -458,-217.6 Y2.1@-457,-216.6 Y2.4@-407,-216.6 ; C57.2@-299,-143.1 -298.94,-143.1 -283.77,-158.27 v1(-283.71,-158.27) -283.71,-158.19 -268,-142.48 C42.2@-268,-142.4 -266.63,-143.77 -237.77,-143.77 C182.2@-236.5,-142.5 ; v1(-252.21,282.68) -252.14,282.68 -237.07,267.6 C54.2@-237,267.6 ; C182.2@-236.5,-142.5 v1(-220.72,-126.77) ; C70.2@-236.1,-111 -236.1,-111.19 -220.72,-126.58 v1(-220.72,-126.77) ; v1(-157.72,251.18) v1(-157.72,251.18) -142.07,235.6 C52.2@-142,235.6 ; v1(-94.73,125.2) -94.73,125.01 -79,109.28 C55.2@-79,109.1 ; C56.2@-79.1,203.9 -79.1,203.99 -63.5,219.59 v1(-63.5,219.68) -63.34,219.68 -47.66,204 C71.2@-47.5,204 ; C184.2@-78.9,298.5 -77.72,299.68 -48.98,299.68 C183.2@-47.6,298.3 -45.69,300.21 -36.86,300.21 -32.62,304.46 C304.2@-1.87,304.46 ; C49.2@-47.42,-142.4 -31.82,-158 v1(-31.74,-158) ; v1(-16,335) -14.85,333.85 -14.85,319.41 -12.62,317.18 -12.62,315.21 C304.2@-1.87,304.46 ; C304.2@0.1,304.46 C304.2@-1.87,304.46 ; C35.2@47,-173.8 v1(62.75,-158) ; C53.2@47,172.6 47.08,172.6 v1(62.75,188.19) v1(62.75,188.19) ; v1@62.78,188.19 C48.2@78.5,172.5 ; C32.2@78.4,-142.5 78.55,-142.5 94.05,-158 v1(94.21,-158) 94.21,-158.15 110,-173.95 C51.2@110,-174.1 ; C34.2@141.9,-143 v1(157.24,-158.27) ; C50.2@204.6,-174.1 188.75,-158.27 188.83,-158.27 204.7,-142.4 C43.2@204.8,-142.4 205.93,-141.27 234.57,-141.27 C181.2@235.9,-142.6
  other v1: -535,-881.31 -533,-850 -494,-848.44 -507.93,-214 -1006,570 -321,812 -388,813 -352.44,813 -321,843.75 -388,844.75 -352.44,844.75 -388,876.5 -352.44,876.5 -321,875.5 -321,907.25 -388,908.25 -352.44,908.25 -388,940 -352.44,940
5V: C232.2 C236.2 C237.2 C244.2 C245.2 J7.1 J7.2 J8.1 Q2.5-6-7-8 Q3.5-6-7-8 R120.2 R121.2 R131.1 R134.1 U12.A2 U12.B2 U12.B3 U12.D2 U12.D3 U12.E2 U13.2 U15.2 U16.2 U17.7 U17.10 | length 9094.9
  Top w9: v1(-1448,880) -1447.08,880.92 -1447.08,903.35 R134.1@-1446.16,904.27 ; v1(-1303,877) -1280.72,899.28 -1260.6,899.28 U17.7@-1260.48,899.4 ; U17.10@-1150,899.4 -1126.4,899.4 v1(-1113.91,886.89) ; R131.1@-960.79,903.27 -959.89,902.37 -959.89,877.89 v1(-959,877)
  Layer 3 w35: J8.1@-1672.5,-1175.4 -1670.32,-1177.59 -1670.32,-1235.48 -1627.8,-1278 1418.5,-1278 J7.2@1540,-1156.5
  Bottom w9: v1(-1113.91,886.89) -959.89,886.89 -959,886 v1(-959,877)
  Bottom w10: v1(-1448,880) -1406.52,921.48 -1347.48,921.48 ; v2(-1347.48,1034.94) -1347.48,921.48 ; v1(-1303,877) -1347.48,921.48 ; v2(-986.7,1034.94) -986.7,969.32 -959,941.62 -959,886 ; v1(-706,988) -692,1002 R120.2@-669,1002
  Bottom w35: v2(-1025.09,1017.14) v2(-1025.09,1052.77) v2(-1025.09,1088.4) -1025.09,1184.81 -1000.7,1209.2 1267.5,1209.2 1540,936.7 J7.1@1540,-1056.5 J7.2@1540,-1156.5
  other v2: -1385.86,1017.14 -1424.25,1034.94 -1063.48,1034.94 -1385.86,1052.77 -1424.25,1070.57 -1347.48,1070.57 -1063.48,1070.57 -986.7,1070.57 -1385.86,1088.4
5V_USB2: C171.1 C178.1 C252.2 L5.1 Q2.1 Q2.2 Q2.3 U17.13
  other v1: -2231,-34 -2202,-34 -2231,-5.23 -2202,-5.23 -2231,23.55 -2202,23.55 -2231,52.32 -2202,52.32 -2231,81.09 -2202,81.09 -1100,956 -1073,956 -1044,956 -1015,956 -1100,979 -1073,979 -1044,979 -1016,979
5V_USB3: C3.1 C261.2 C296.1 C302.1 L3.2 Q3.1 Q3.2 Q3.3 R12.2 R79.2 R80.1 U14.30 U17.4 | length 1058.9
  Top w7: R79.2@-1331.31,279 -1329.42,280.9 -1313.1,280.9 v1(-1297.61,296.39) -1297.61,321.25 U14.30@-1297.5,321.36 ; R12.2@-1191.31,393 v1(-1165,393)
  Top w9: Q3.3@-1373.07,964.27 -1369.69,967.64 -1369.69,981.28 -1364.42,986.55 -1337.55,986.55 -1303.55,952.55 U17.4@-1260.48,952.55 ; C3.1@-1331.32,248 R79.2@-1331.31,279
  Bottom w10: -1702.5,497.3 -1432.7,497.3 -1380.2,444.8 -1380.2,343 -1362,324.8 -1303.36,324.8 -1301.89,323.34 -1297.5,318.94 ; v1(-1297.61,296.39) -1297.5,296.5 -1297.5,318.94 ; R80.1@-1191.32,393 v1(-1165,393) -1165,328.8 -1179.2,314.6 -1293.16,314.6 -1297.5,318.94
  other v1: -1464,954 -1437,954 -1408,954 -1379,954 -1464,977 -1437,977 -1408,977 -1380,977
ACTLED0: J2.13 R89.2 U6.32 | length 2078.5
  Top w8: v1(-900,-109) -893.1,-115.9 U6.32@-858.4,-115.9
  Layer 1 w8: J2.13@-2448.46,-865.83 -2448.45,-733.45 -2290,-575 -2156,-575 -1958,-377 -1754,-377 -1700,-431 -1201,-431 -1026,-256 -1026,-171 -995,-140 -931,-140 v1(-900,-109)
ACTLED1: R73.2 R75.1 U6.33 | length 1597.6
  Top w6: v1(-932,-110.65) -925.82,-116.84 -925.82,-124.88 -919.1,-131.6 U6.33@-858.4,-131.6
  Top w8: R75.1@-2231.5,-341 -2196.16,-341 -2183.16,-328 v1(-2181,-328) ; v1(-932,-110.65) R73.2@-932,-108.69
  Layer 1 w8: v1(-2181,-328) -1766,-328 -1691,-403 -1203,-403 -1047,-247 -1047,-159 -998.65,-110.65 v1(-932,-110.65)
ACTLED2: R72.2 U6.34 | length 123.8
  Top w6: R72.2@-965,-108.69 -965,-110.65 -933.49,-142.16 -892.24,-142.16 -887,-147.4 U6.34@-858.4,-147.4
AD9361_CLK_IN: C199.2 R88.2 R140.1 | length 3050.1
  Top w4.2: R140.1@-1743.66,1096.35 R140.1@-1743.01,1097 ; R88.2@810.81,215.46 R88.2@811,215.65
  Top w6: R140.1@-1743.01,1097 v1(-1704,1097) ; C199.2@810.81,182.46 R88.2@810.81,215.46 ; R88.2@811,215.65 v1(811,241)
  Layer 2 w6: v1(-1704,1097) -1644,1097 -1545,998 -1545,858 -1293,606 446,606 v1(811,241)
AD9361_CLK_OUT: U1.U10 U11.J6 | length 1285
  Top w4.2: U1.U10@204.48,-16.54 v1(220.23,-32.28) ; U11.J6@1040.49,16.95 v1(1056.24,32.7)
  Layer 2 w5: v1(220.23,-32.28) 173,14.94 173,68 183,78 285,78 298,91 355,91 585,-139 v1(750,-139)
  Bottom w4.2: v1(750,-139) 776.06,-139 807.68,-107.38 969.72,-107.38 977.8,-99.3 977.8,5.7 987.4,15.3 1006.2,15.3 1023.6,32.7 v1(1056.24,32.7)
AD9361_CTRL_IN0: U1.T10 U11.C5 | length 1108.3
  Top w4: U1.T10@172.98,-16.54 U1.T10@173.46,-16.54 ; v1@188.92,-32 v1(189.4,-32)
  Top w4.2: U1.T10@173.46,-16.54 v1@188.92,-32 ; U11.C5@1071.98,-172.02 v1(1087.73,-187.77)
  Layer 2 w5: v1(189.4,-32) 204.18,-46.78 318.23,-46.78 432.94,-161.5 443.5,-161.5 559,-277 1043.55,-277 1056,-264.55 1056,-239 1087.73,-207.27 v1(1087.73,-187.77)
AD9361_CTRL_IN1: U1.Y12 U11.C6 | length 914.9
  Top w4.2: U1.Y12@298.97,46.46 313.43,32 337,32 588.7,-219.7 v1(765,-219.7) ; U11.C6@1040.49,-172.02 v1(1056.24,-187.77)
  Layer 2 w5: v1(765,-219.7) 809.7,-219.7 824,-234 1010.01,-234 v1(1056.24,-187.77)
AD9361_CTRL_IN2: U1.Y13 U11.D6 | length 914.9
  Top w4.2: U1.Y13@298.97,77.95 329.92,47 352,47 587,-188 v1(768,-188) ; U11.D6@1040.49,-140.53 v1(1056.24,-156.28)
  Layer 2 w5: v1(768,-188) 816.59,-188 831.09,-202.5 1010.01,-202.5 v1(1056.24,-156.28)
AD9361_CTRL_IN3: U1.V11 U11.D5 | length 1072.7
  Top w4.2: U1.V11@235.98,14.96 v1(251.72,30.71) ; U11.D5@1071.98,-140.53 v1(1087.73,-156.28)
  Layer 1 w5: v1(251.72,30.71) 269.43,13 339,13 629,-277 992,-277 1073.23,-195.77 1073.23,-170.78 v1(1087.73,-156.28)
AD9361_CTRL_OUT0: U1.T11 U11.D4 | length 1132
  Top w4.2: U1.T11@172.98,14.96 v1(188.73,30.71) ; U11.D4@1103.48,-140.53 v1(1119.23,-156.28)
  Layer 2 w5: v1(188.73,30.71) 189.44,30 200,30 243,-13 333,-13 565.5,-245.5 1019.01,-245.5 1070.74,-193.78 1070.74,-184.26 1084.22,-170.78 1104.73,-170.78 v1(1119.23,-156.28)
AD9361_CTRL_OUT1: U1.T14 U11.E4 | length 1209.2
  Top w4.2: U1.T14@172.98,109.45 v1(188.73,125.2) ; U11.E4@1103.48,-109.03 v1(1119.23,-124.78)
  Layer 3 w5: v1(188.73,125.2) 205.43,108.5 331.5,108.5 674.2,-234.2 1078,-234.2 1102.23,-209.97 1102.23,-141.78 v1(1119.23,-124.78)
AD9361_CTRL_OUT2: U1.T15 U11.E5 | length 1159.4
  Top w4.2: U1.T15@172.98,140.94 v1(188.73,156.69) ; U11.E5@1071.98,-109.03 v1(1087.73,-124.78)
  Layer 3 w5: v1(188.73,156.69) 204.43,141 333,141 678,-204 1066,-204 1072.73,-197.27 1072.73,-150.77 1085.63,-137.87 1085.63,-126.88 v1(1087.73,-124.78)
AD9361_CTRL_OUT3: U1.T17 U11.E6 | length 1217.2
  Top w4.2: U1.T17@172.98,203.94 v1(188.73,219.68) ; U11.E6@1040.49,-109.03 v1(1056.24,-124.78)
  Layer 3 w5: v1(188.73,219.68) 190.02,219.68 200.34,230 203,230 209,236 227,236 236,245 236,255.96 248.21,268.18 257.73,268.18 269.36,279.81 269.36,288.37 285,304 387,304 425,266 691,266 850.73,106.27 850.73,69.73 881.76,38.71 881.76,29.19 894.95,16 1008,16 1020,4 1020,-88.54 v1(1056.24,-124.78)
AD9361_CTRL_OUT4: U1.T19 U11.F6 | length 1170.4
  Top w4.2: U1.T19@172.98,266.93 v1(188.73,282.68) ; U11.F6@1040.49,-77.54 v1(1056.24,-93.28)
  Layer 1 w5: v1(188.73,282.68) 210.06,304 804,304 1002,106 1002,75.95 1009,68.95 1009,-46.05 v1(1056.24,-93.28)
AD9361_CTRL_OUT5: U1.T20 U11.F5 | length 1379.4
  Top w4.2: v1(171,351) 172.49,349.51 172.49,298.92 U1.T20@172.98,298.43 ; U11.F5@1071.98,-77.54 v1(1087.73,-93.28)
  Layer 1 w5: v1(171,351) 202,382 891,382 1104.73,168.27 1104.73,-76.29 v1(1087.73,-93.28)
AD9361_CTRL_OUT6: R2.2 U1.U13 U11.F4 | length 1267.7
  Top w4.2: U1.U13@204.48,77.95 v1(220.23,93.7) ; U11.F4@1103.48,-77.54 v1(1119.23,-93.28)
  Layer 3 w5: v1(220.23,93.7) 234.43,79.5 337.5,79.5 v1(349,68) 660.2,-243.2 1104,-243.2 1133.73,-213.47 1133.73,-107.78 v1(1119.23,-93.28)
  Bottom w4.2: v1(349,68) 349,70 357,78 R2.2@375.31,78
AD9361_CTRL_OUT7: U1.V13 U11.G4 | length 1376
  Top w4.2: U1.V13@235.98,77.95 v1(252,94) ; U11.G4@1103.48,-46.04 v1(1119.23,-30.29)
  Layer 1 w5: v1(252,94) 235,77 235,19 254,0 329,0 617,-288 1032.55,-288 1057,-263.55 1057,-246 1085,-218 1115,-218 1135,-198 1135,-46.06 v1(1119.23,-30.29)
AD9361_DATA_CLK_N: U1.P20 U11.H11 | length 1285.1
  Top w4: U1.P20@109.99,298.43 109.99,298.63 101.24,307.38 101.24,350.24 130,379 366.54,379 433.27,312.27 496.52,249.02 504.94,240.61 519.85,240.61 532.65,253.41 534.56,253.41 539.02,248.96 539.02,247.05 511.37,219.4 511.37,205.89 524.02,193.24 537.53,193.24 565.18,220.88 567.09,220.88 571.54,216.43 571.54,214.52 555.94,198.92 555.94,185.41 568.6,172.76 582.1,172.76 595.91,186.57 597.82,186.57 602.28,182.11 602.28,180.2 588.47,166.39 588.47,152.89 601.12,140.23 614.63,140.23 617.43,143.03 619.34,143.03 623.79,138.57 623.79,136.66 623.79,121.75 642.77,102.77 671.94,73.61 673.35,72.19 676.67,72.19 678.3,73.82 680.21,73.82 684.66,69.37 684.66,67.46 673.31,56.11 673.31,54.2 677.77,49.75 679.68,49.75 686.08,56.15 689.39,56.15 695.77,49.77 708.7,36.84 708.7,31.3 v1(711,29) ; v1(867.26,1.2) U11.H11@883.01,-14.54
  Layer 3 w4: v1(711,29) 711,32.25 715.5,36.75 715.5,47.56 724.29,56.34 789.01,56.34 854.4,-9.04 857.71,-9.04 867.26,0.5 v1(867.26,1.2)
AD9361_DATA_CLK_P: U1.N20 U11.G11 | length 1284.1
  Top w4: U1.N20@78.5,298.43 78.5,298.63 87.24,307.38 87.24,356.04 124.2,393 372.34,393 443.17,322.17 506.42,258.92 510.74,254.61 514.05,254.61 526.85,267.41 540.36,267.41 553.02,254.75 553.02,241.25 525.37,213.6 525.37,211.69 529.82,207.24 531.73,207.24 559.38,234.88 572.89,234.88 585.54,222.23 585.54,208.72 569.94,193.12 569.94,191.21 574.4,186.76 576.31,186.76 590.11,200.57 603.62,200.57 616.28,187.91 616.28,174.4 602.47,160.59 602.47,158.69 606.92,154.23 608.83,154.23 611.63,157.03 625.14,157.03 637.79,144.37 637.79,130.87 637.79,127.55 652.67,112.67 723.05,42.3 723.05,40.2 731,32.25 v1(731,29) ; v1(867.26,-30.29) U11.G11@883.01,-46.04
  Layer 3 w4: v1(731,29) 731,32.25 726.5,36.75 726.5,43 728.84,45.34 784.46,45.34 849.84,-20.04 857.71,-20.04 867.26,-29.59 v1(867.26,-30.29)
AD9361_EN_AGC: U1.P16 U11.G5 | length 1266.9
  Top w4.2: U1.P16@109.99,172.44 v1(125.74,188.19) ; U11.G5@1071.98,-46.04 v1(1087.73,-30.29)
  Layer 3 w5: v1(125.74,188.19) 141.93,172 327,172 670.6,-171.6 1020,-171.6 1049.82,-141.78 1066.46,-141.78 1073.23,-135 1073.23,-44.79 v1(1087.73,-30.29)
AD9361_ENABLE: U1.R18 U11.G6 | length 1203.6
  Top w4.2: U1.R18@141.49,235.43 v1(157.24,251.18) ; U11.G6@1040.49,-46.04 v1(1056.24,-30.29)
  Layer 1 w5: v1(157.24,251.18) 174,267.94 174,288.45 205.55,320 819,320 1011,128 1011,87 1018.04,79.96 1032.04,79.96 1041.74,70.26 1041.74,-15.79 v1(1056.24,-30.29)
AD9361_FB_CLK_N: U1.P19 U11.G10 | length 1320.6
  Top w4: U11.G10@914.5,-46.04 914.5,-46.27 930,-61.77 v1(930,-62)
  Top w4.2: U1.P19@109.99,266.93 v1(125.74,282.68)
  Layer 2 w4: v1(125.74,282.68) 125.74,284.52 119.24,291.02 119.24,345.24 157,383 364.44,383 536.89,210.55 536.89,-26.89 559,-49 566.78,-56.78 566.78,-60.09 562.11,-64.76 562.11,-66.67 566.56,-71.13 568.47,-71.13 575.97,-63.63 577.88,-63.63 582.33,-68.09 582.33,-70 576.31,-76.02 576.31,-77.93 580.76,-82.38 582.67,-82.38 585.87,-79.18 589.18,-79.18 597,-87 909.36,-87 920,-76.36 920,-68.49 922.34,-66.14 922.61,-66.14 926.75,-62 v1(930,-62)
AD9361_FB_CLK_P: U1.N18 U11.F10 | length 1320.5
  Top w4: v1(899,-62) U11.F10@914.5,-77.54
  Top w4.2: U1.N18@78.5,235.43 v1(94.24,251.18)
  Layer 2 w4: v1(94.24,251.18) 109.81,266.75 109.81,284.9 108.24,286.46 108.24,349.8 152.44,394 369,394 547.89,215.11 547.89,-22.33 551.78,-26.22 601.56,-76 904.8,-76 909,-71.8 909,-68.49 906.66,-66.14 906.39,-66.14 902.25,-62 v1(899,-62)
AD9361_RESET: R119.1 U1.N17 U11.K5 | length 1438
  Top w4.2: U1.N17@78.5,203.94 v1(94.24,219.68) ; U11.K5@1071.98,48.45 1089.31,65.77 1089.31,123.66 1134.4,168.75 1134.4,172.68 1088.38,218.7 v1(1086.7,218.7)
  Layer 1 w5: v1(94.24,219.68) 111,236.44 111,336 173,398 905.7,398 1085,218.7 v1(1086.7,218.7)
AD9361_RX_D0_N: U1.Y19 U11.K11 | length 1266.4
  Top w4: U1.Y19@298.97,266.93 299.17,266.93 307.92,258.18 327.42,258.18 341.22,271.98 ; 740.34,124 769.54,124 821.64,71.9 821.64,67.92 827.04,62.52 868.94,62.52 U11.K11@883.01,48.45
  Layer 3 w4: v1(345,280) 347.11,282.11 359,282.11 362.41,285.52 380.04,285.52 383.26,282.3 398.28,267.28 401.97,263.59 419.33,246.22 419.33,233.8 405.29,219.75 405.29,217.84 409.74,213.39 411.65,213.39 447.61,249.35 458.64,249.35 469.53,238.45 469.53,227.43 433.57,191.47 433.57,189.56 438.03,185.1 439.94,185.1 475.9,221.06 486.92,221.06 497.82,210.16 497.82,199.14 461.86,163.18 461.86,161.27 466.31,156.82 468.22,156.82 504.18,192.78 515.2,192.78 526.1,181.88 526.1,170.86 490.14,134.9 490.14,132.99 494.6,128.53 496.51,128.53 532.47,164.49 543.49,164.49 554.39,153.6 554.39,142.57 540.34,128.53 540.34,125.21 542.59,122.97 543.06,122.5 549.5,122.5 566,122.5 571.22,122.5 573.57,124.84 573.57,144.71 581.36,152.5 596.77,152.5 604.57,144.71 604.57,93.85 605.92,92.5 612.22,92.5 613.57,93.85 613.57,140.6 621.36,148.39 636.77,148.39 644.57,140.6 644.57,124.84 646.91,122.5 662.95,122.5 724.25,122.5 728.75,127 v1(732,127)
AD9361_RX_D0_P: U1.Y18 U11.J12 | length 1266.7
  Top w4: U1.Y18@298.97,235.43 299.17,235.43 307.92,244.18 333.22,244.18 351.12,262.08 ; 740.34,110 763.74,110 786.37,87.37 787.78,85.95 791.1,85.95 792.48,87.34 794.39,87.34 798.84,82.88 798.84,80.97 794.15,76.28 794.15,74.37 798.6,69.91 800.51,69.91 803.83,69.91 807.37,66.37 811.74,62 816.25,62 821.07,57.18 821.07,53.87 818,50.8 818,39.2 827.96,29.24 839.23,29.24 U11.J12@851.51,16.95
  Layer 3 w4: v1(359.14,265.86) 359.14,266.69 366.97,274.52 375.48,274.52 390.5,259.5 394.19,255.81 408.33,241.66 408.33,238.35 394.29,224.31 394.29,213.28 405.19,202.39 416.21,202.39 452.17,238.35 454.08,238.35 458.53,233.89 458.53,231.98 422.57,196.02 422.57,185 433.47,174.1 444.49,174.1 480.45,210.06 482.36,210.06 486.82,205.61 486.82,203.7 450.86,167.74 450.86,156.72 461.76,145.82 472.78,145.82 508.74,181.78 510.65,181.78 515.1,177.32 515.1,175.41 479.14,139.45 479.14,128.43 490.04,117.53 501.06,117.53 537.02,153.49 538.93,153.49 543.39,149.04 543.39,147.13 529.34,133.08 529.34,120.66 534.81,115.19 538.5,111.5 566,111.5 575.78,111.5 584.57,120.29 584.57,140.15 585.92,141.5 592.22,141.5 593.57,140.15 593.57,89.29 601.36,81.5 616.77,81.5 624.57,89.29 624.57,136.04 625.92,137.39 632.22,137.39 633.57,136.04 633.57,120.29 642.35,111.5 662.95,111.5 724.25,111.5 728.75,107 v1(732,107)
AD9361_RX_D1_N: U1.V18 U11.K10 | length 1328.2
  Top w4: U1.V18@235.98,235.43 v1(251.72,251.18) ; v1(898.76,64.2) U11.K10@914.5,48.45
  Layer 1 w4: v1(251.72,251.18) 265.96,236.94 285.76,236.94 297.7,225 337.82,225 349.65,225 358.43,216.21 358.43,205.14 359.78,203.79 366.08,203.79 367.43,205.14 367.43,217.47 375.23,225.27 390.64,225.27 398.43,217.47 398.43,202.04 399.78,200.69 406.08,200.69 407.43,202.04 407.43,217.21 415.23,225 430.64,225 438.43,217.21 438.43,202.04 439.78,200.69 446.08,200.69 447.43,202.04 447.43,217.21 455.23,225 470.64,225 478.43,217.21 478.43,196.35 479.78,195 486.08,195 487.43,196.35 487.43,217.21 495.23,225 510.64,225 518.43,217.21 518.43,196.35 519.78,195 526.08,195 527.43,196.35 527.43,217.21 535.23,225 550.64,225 558.43,217.21 558.43,196.35 559.78,195 566.08,195 567.43,196.35 567.43,217.21 575.23,225 590.64,225 598.43,217.21 598.43,196.35 599.78,195 606.08,195 607.43,196.35 607.43,217.21 615.23,225 630.64,225 638.43,217.21 638.43,196.35 639.78,195 646.08,195 647.43,196.35 647.43,216.21 656.22,225 666,225 682.56,225 703.28,204.28 706.97,200.59 710.28,200.59 724.33,214.63 735.35,214.63 746.25,203.73 746.25,192.71 728.4,174.86 728.4,172.95 732.86,168.5 734.77,168.5 752.61,186.35 763.64,186.35 774.53,175.45 774.53,164.43 753.19,143.08 753.19,141.17 757.64,136.71 759.55,136.71 780.9,158.06 791.92,158.06 802.82,147.16 802.82,136.14 774.97,108.29 774.97,106.39 779.42,101.93 781.33,101.93 787.27,107.86 799.69,107.86 803.13,104.43 806.82,100.73 835.56,72 867.23,72 875.04,64.2 v1(898.76,64.2)
AD9361_RX_D1_P: U1.V17 U11.J11 | length 1328.2
  Top w4: U1.V17@235.98,203.94 v1(251.72,219.68) ; v1(867.26,32.7) U11.J11@883.01,16.95
  Layer 1 w4: v1(251.72,219.68) 265.72,205.68 289.02,205.68 297.33,214 337.82,214 345.09,214 347.43,211.66 347.43,200.58 355.23,192.79 370.64,192.79 378.43,200.58 378.43,212.92 379.78,214.27 386.08,214.27 387.43,212.92 387.43,197.49 395.23,189.69 410.64,189.69 418.43,197.49 418.43,212.65 419.78,214 426.08,214 427.43,212.65 427.43,197.49 435.23,189.69 450.64,189.69 458.43,197.49 458.43,212.65 459.78,214 466.08,214 467.43,212.65 467.43,191.79 475.23,184 490.64,184 498.43,191.79 498.43,212.65 499.78,214 506.08,214 507.43,212.65 507.43,191.79 515.23,184 530.64,184 538.43,191.79 538.43,212.65 539.78,214 546.08,214 547.43,212.65 547.43,191.79 555.23,184 570.64,184 578.43,191.79 578.43,212.65 579.78,214 586.08,214 587.43,212.65 587.43,191.79 595.23,184 610.64,184 618.43,191.79 618.43,212.65 619.78,214 626.08,214 627.43,212.65 627.43,191.79 635.23,184 650.64,184 658.43,191.79 658.43,211.66 660.78,214 666,214 678,214 695.5,196.5 699.19,192.81 702.41,189.59 714.84,189.59 728.89,203.63 730.8,203.63 735.25,199.18 735.25,197.27 717.4,179.42 717.4,168.4 728.3,157.5 739.32,157.5 757.17,175.35 759.08,175.35 763.53,170.89 763.53,168.98 742.19,147.63 742.19,136.61 753.08,125.71 764.11,125.71 785.45,147.06 787.36,147.06 791.82,142.61 791.82,140.7 763.97,112.85 763.97,101.83 774.87,90.93 785.89,90.93 791.82,96.86 795.14,96.86 795.35,96.65 799.04,92.96 802.5,89.5 810.28,81.72 810.28,78.41 807.57,75.7 807.57,73.79 812.03,69.34 813.94,69.34 816.64,72.04 819.96,72.04 827,65 831,61 862.68,61 867.26,56.42 v1(867.26,32.7)
AD9361_RX_D2_N: U1.W20 U11.K9 | length 1329.9
  Top w4: U1.W20@267.47,298.43 266.14,298.43 257.85,306.72 257.85,325.2 272.65,340 341.96,340 350.98,330.98 400.31,281.65 408.72,273.24 423.63,273.24 431.46,281.06 433.37,281.06 437.82,276.61 437.82,274.7 408.08,244.96 408.08,231.45 420.74,218.79 434.25,218.79 463.99,248.53 465.9,248.53 470.35,244.08 470.35,242.17 446.59,218.41 446.59,204.9 459.25,192.25 472.76,192.25 482.44,201.93 484.35,201.93 488.8,197.48 488.8,195.57 479.12,185.89 479.12,172.38 491.78,159.72 505.28,159.72 515.18,169.62 517.09,169.62 521.55,165.17 521.55,163.26 511.65,153.36 511.65,139.85 524.3,127.2 537.81,127.2 559.54,148.92 561.45,148.92 565.9,144.47 565.9,142.56 544.17,120.83 544.17,107.32 556.83,94.67 570.34,94.67 592.28,116.62 594.19,116.62 598.65,112.16 598.65,110.25 576.7,88.3 576.7,74.8 589.36,62.14 602.86,62.14 621.04,80.32 622.95,80.32 627.4,75.86 627.4,73.95 625.16,71.71 625.16,56.8 634.48,47.48 652.08,29.88 652.08,28.76 655.8,25.04 v1(655.8,21.79) ; v1(930.25,64.2) U11.K9@946,48.45
  Layer 1 w4: v1(655.8,21.79) 658.03,19.56 664.52,19.56 687.16,-3.08 851.75,-3.08 861.46,-12.8 873.06,-12.8 884.76,-1.1 884.76,7 892.96,15.2 901.06,15.2 913.7,27.84 913.7,47.64 v1(930.25,64.2)
AD9361_RX_D2_P: U1.V20 U11.J10 | length 1329.9
  Top w4: U1.V20@235.98,298.43 235.98,299.75 243.85,307.63 243.85,331 266.85,354 347.76,354 360.88,340.88 410.21,291.55 414.52,287.24 417.84,287.24 425.66,295.06 439.17,295.06 451.82,282.41 451.82,268.9 422.08,239.16 422.08,237.25 426.54,232.79 428.45,232.79 458.19,262.53 471.7,262.53 484.35,249.88 484.35,236.37 460.59,212.61 460.59,210.7 465.05,206.25 466.96,206.25 476.64,215.93 490.15,215.93 502.8,203.27 502.8,189.77 493.12,180.09 493.12,178.18 497.57,173.72 499.48,173.72 509.38,183.62 522.89,183.62 535.55,170.97 535.55,157.46 525.65,147.56 525.65,145.65 530.1,141.2 532.01,141.2 553.74,162.92 567.25,162.92 579.9,150.27 579.9,136.76 558.17,115.03 558.17,113.12 562.63,108.67 564.54,108.67 586.48,130.62 599.99,130.62 612.65,117.96 612.65,104.45 590.7,82.51 590.7,80.6 595.15,76.14 597.06,76.14 615.24,94.32 628.74,94.32 641.4,81.66 641.4,68.15 639.16,65.91 639.16,62.6 644.38,57.38 661.98,39.78 662.97,39.78 666.75,36 v1(669.87,36) ; v1(898.76,32.7) U11.J10@914.5,16.95
  Layer 1 w4: v1(669.87,36) 672.17,33.7 672.17,27.47 691.72,7.92 757,7.92 759,7.92 761.34,10.26 761.34,19.19 762.69,20.54 768.99,20.54 770.34,19.19 770.34,6.27 771.69,4.92 777.99,4.92 779.34,6.27 779.34,18.8 780.69,20.15 786.99,20.15 788.34,18.8 788.34,10.26 790.69,7.92 818,7.92 853.26,7.92 860.55,15.2 873.06,15.2 874.54,13.73 877.85,13.73 890.33,26.2 890.41,26.2 896.91,32.7 v1(898.76,32.7)
AD9361_RX_D3_N: U1.R17 U11.K8 | length 1283.4
  Top w4: U1.R17@141.49,203.94 v1(157.24,219.68) ; v1(961.75,64.2) U11.K8@977.5,48.45
  Layer 3 w4: v1(157.24,219.68) 157.24,221.53 163.73,228.03 163.73,232.73 174.73,243.73 174.73,256.98 183.75,266 197,266 205.82,274.82 205.82,288.06 214.63,296.88 225.82,296.88 282.94,354 644.56,354 703.78,294.78 707.47,291.09 710.78,291.09 724.83,305.13 735.85,305.13 746.75,294.23 746.75,283.21 725.01,261.47 725.01,259.56 729.47,255.11 731.38,255.11 752.24,275.97 763.26,275.97 774.16,265.07 774.16,254.05 757.05,236.95 757.05,235.04 761.51,230.58 763.42,230.58 767.35,234.52 778.37,234.52 789.27,223.62 789.27,212.6 789.27,209.28 803.78,194.78 807.47,191.08 847.78,150.78 849.19,149.36 852.51,149.36 860.5,157.36 862.41,157.36 866.87,152.9 866.87,150.99 856.05,140.18 856.05,138.27 860.5,133.81 862.41,133.81 866.83,138.23 868.74,138.23 873.19,133.77 873.19,131.87 871.6,130.27 871.6,126.96 875.36,123.19 876.78,121.78 972.22,121.78 986.78,107.22 990,104 990,88.59 972.1,70.69 970.09,70.69 963.6,64.2 v1(961.75,64.2)